# Altium PCB IMU_Shield.PcbDoc
Units mm, origin at the board's own origin, x right, y up, seen from the top; angles counter-clockwise.
Board outline 68.6 x 53.3 mm, 2 copper layers (Top Layer, Bottom Layer); 30 components, 25 nets, 123 pads, 40 vias.
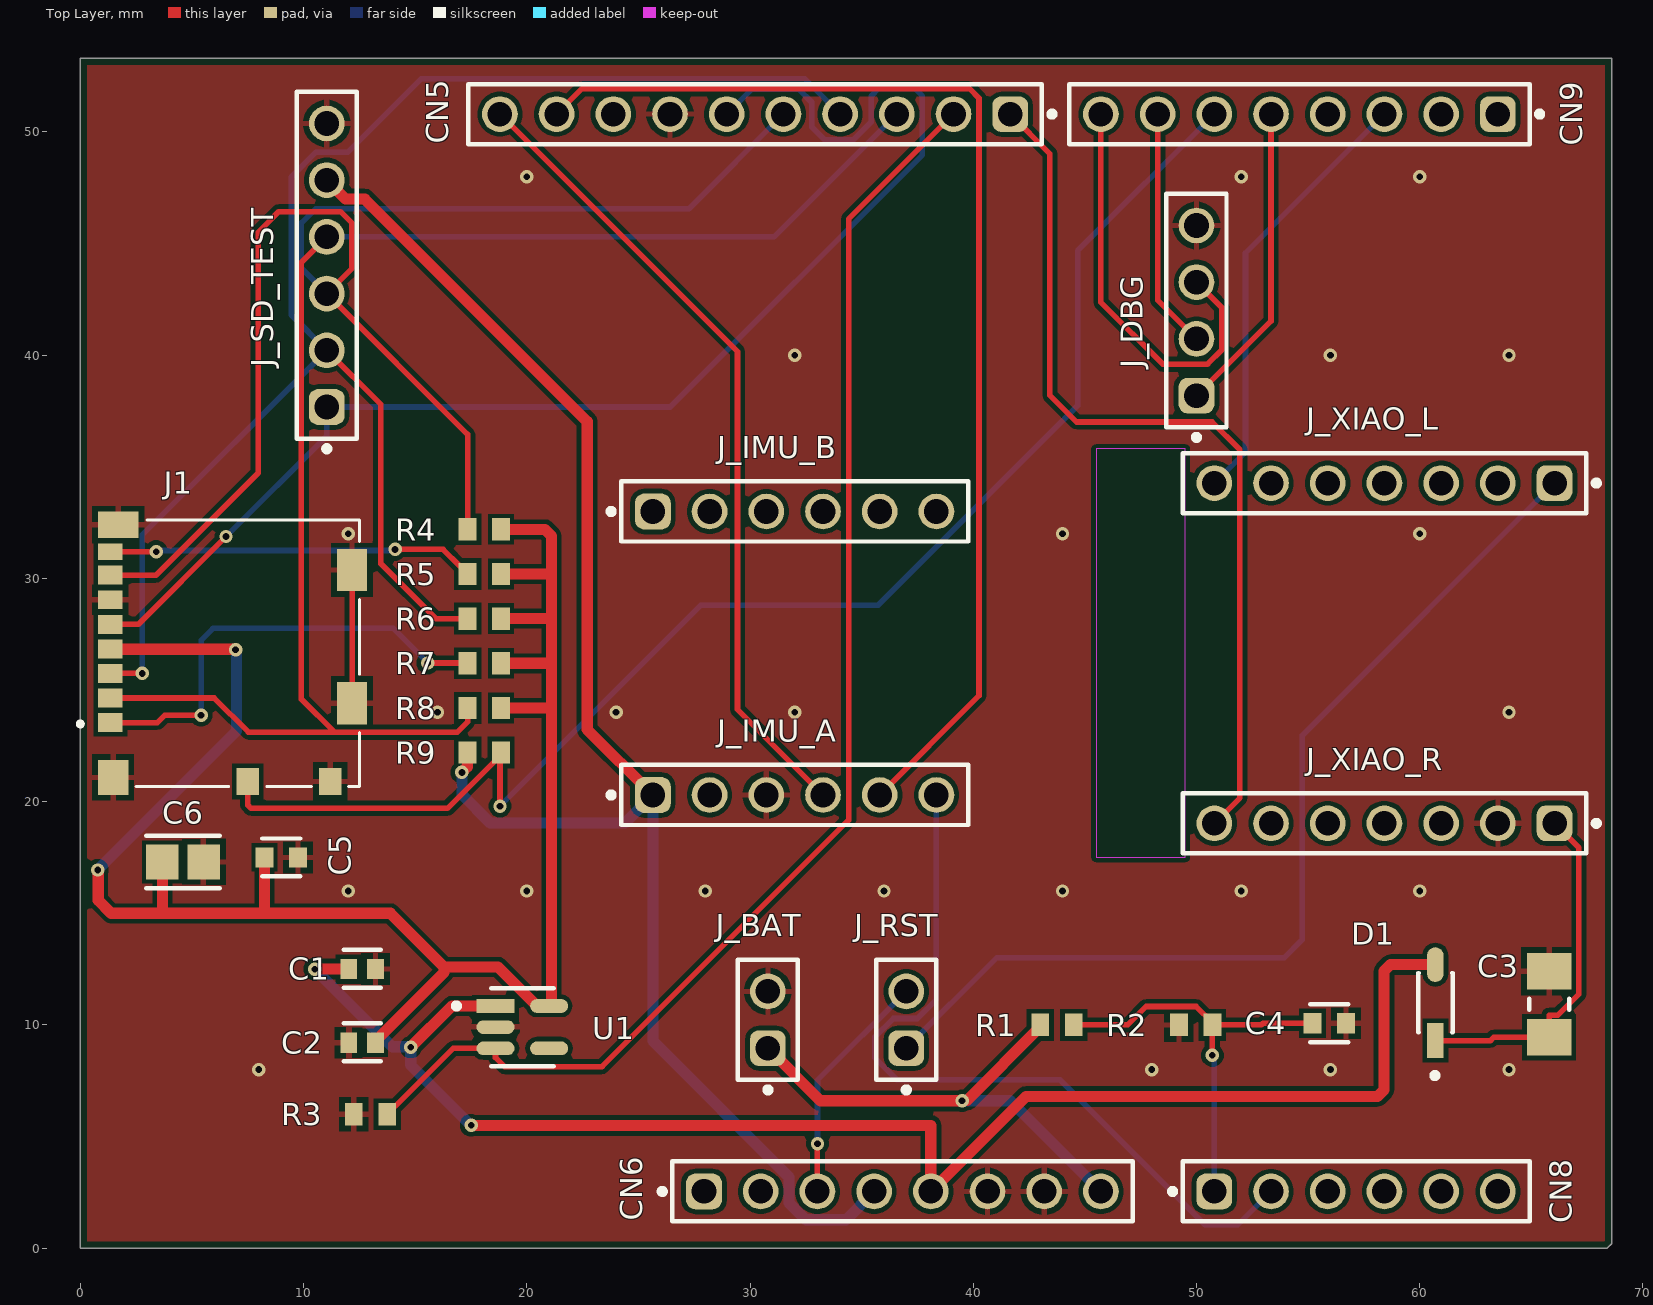
[diagram p0: Top Layer view]
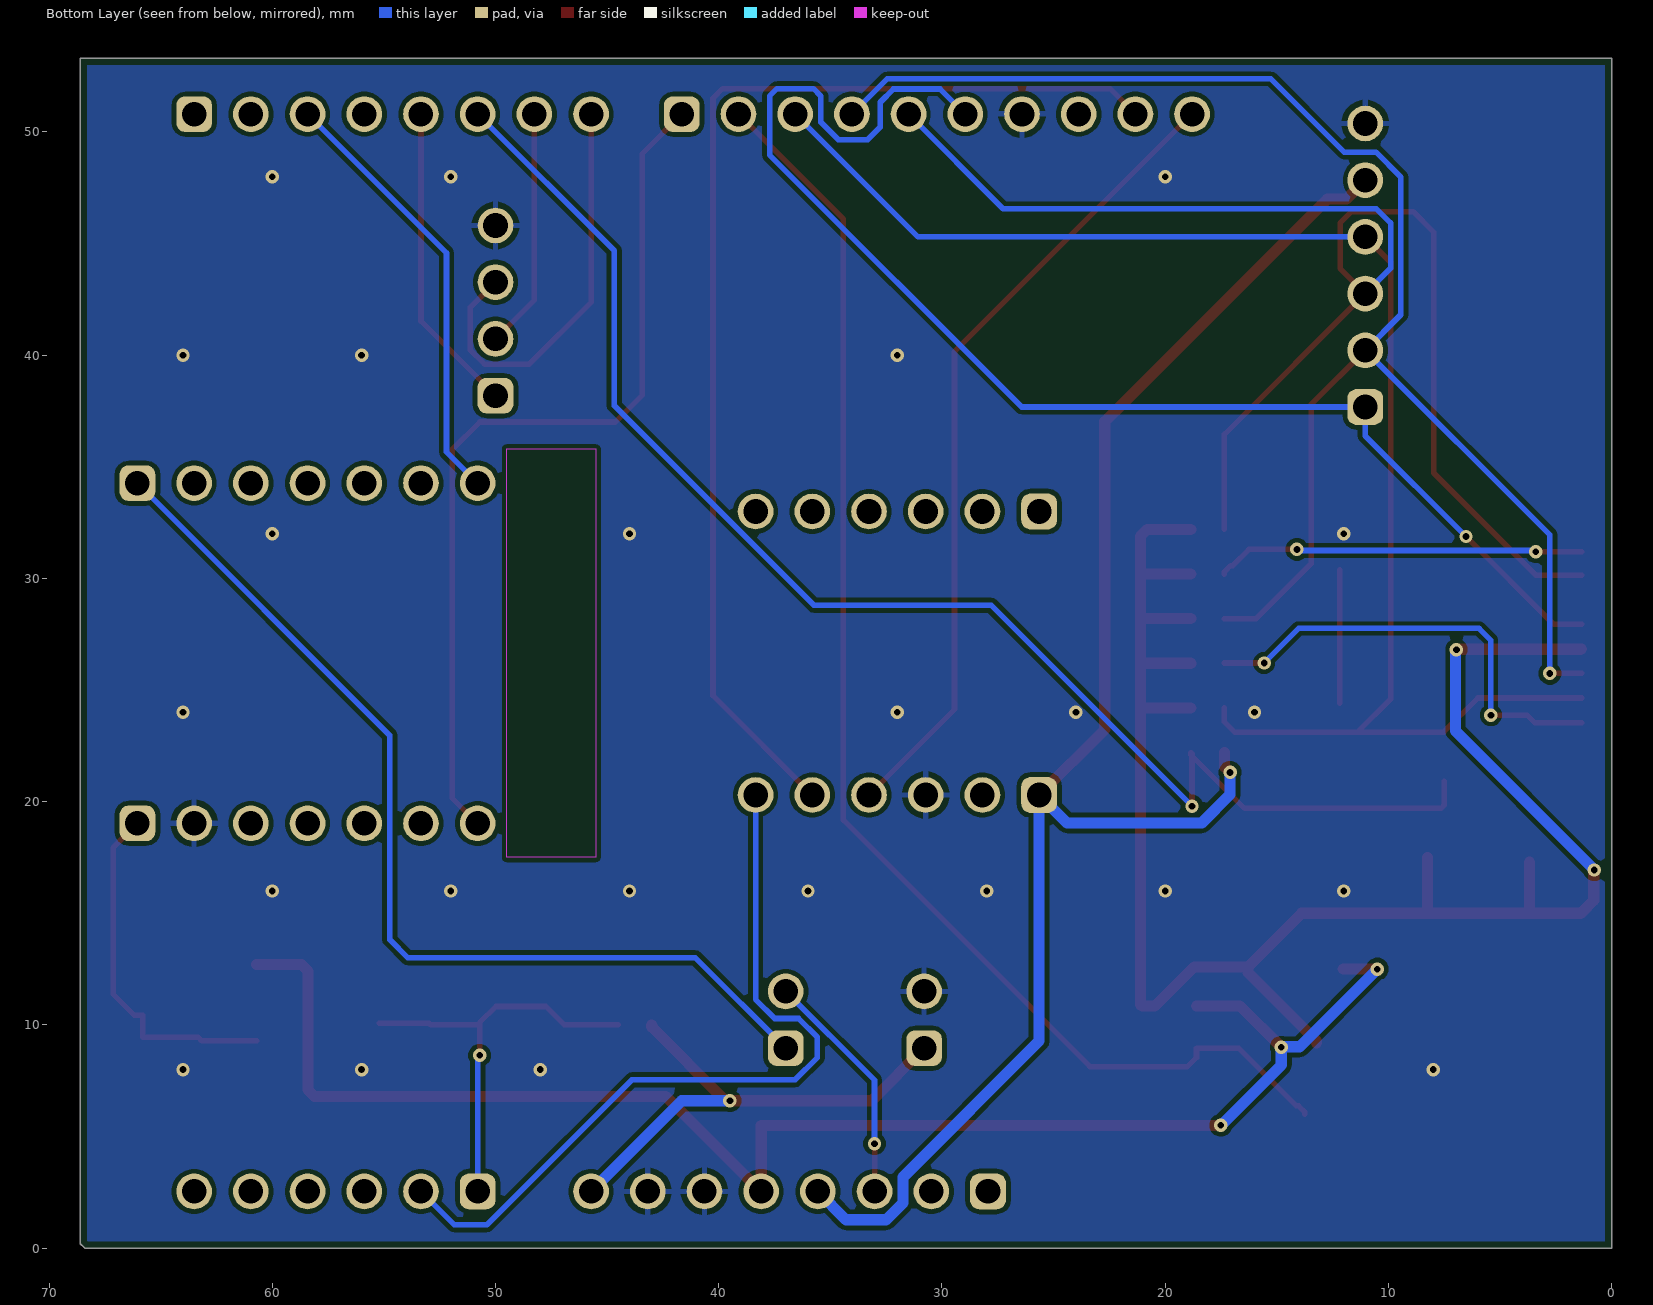
[diagram p1: Bottom Layer view, seen from below]
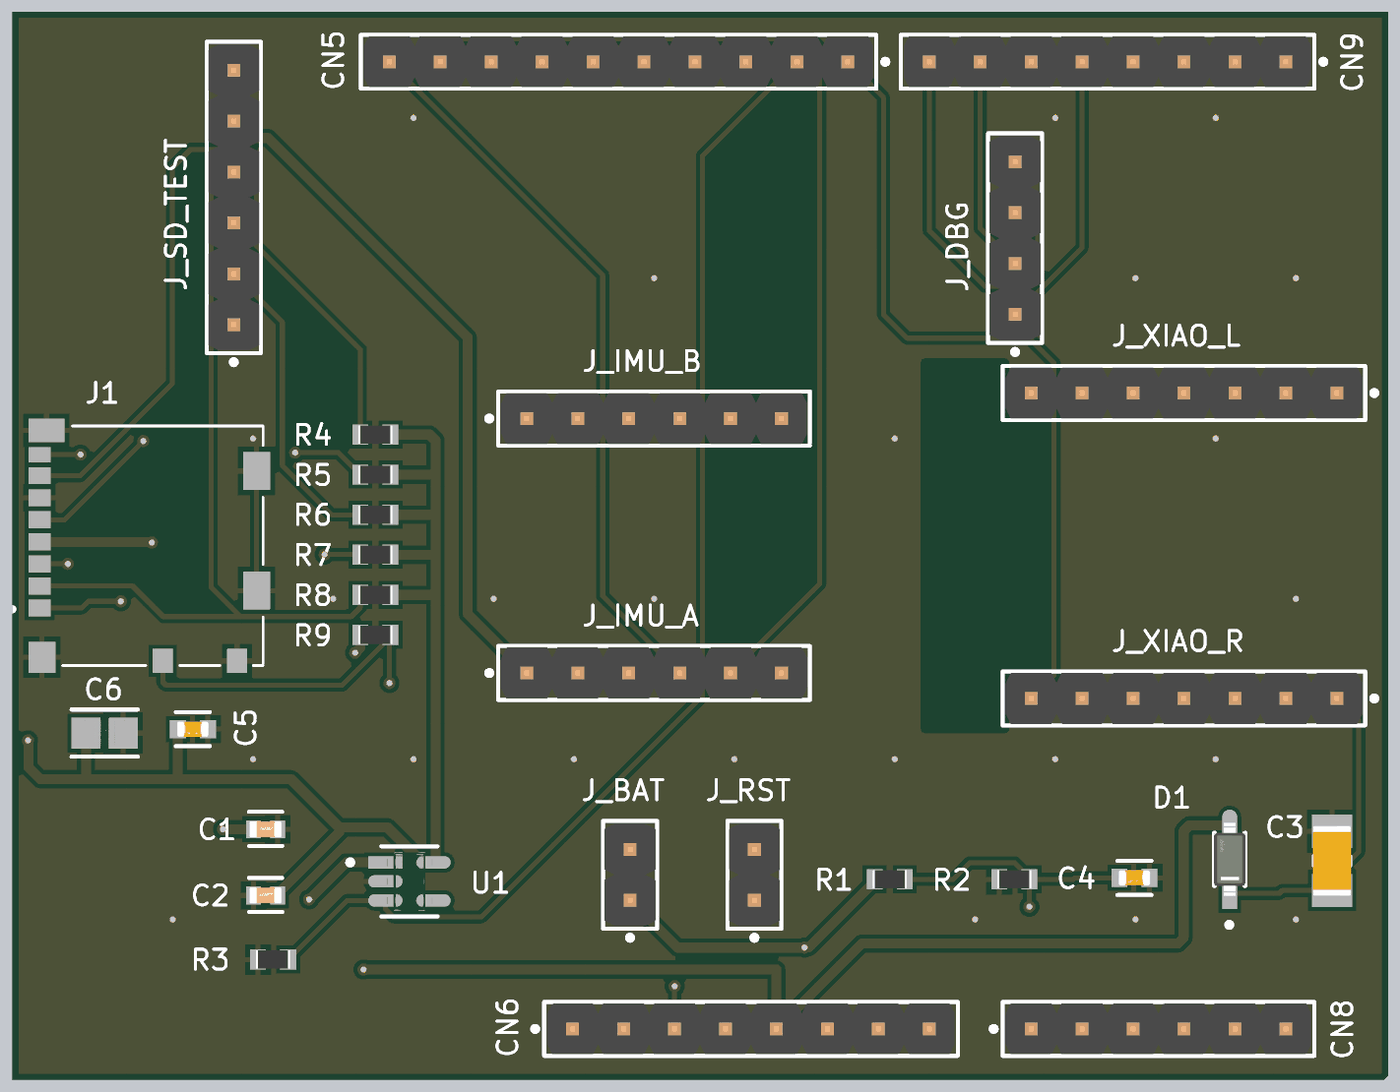
[diagram p2: 3D render of the assembled board from above, using the file's embedded part models]

## Layer stack, top to bottom
Top Solder: solder mask 0.0102, Solder Resist, Dk 3.5
Top Layer: signal copper 0.0356
Dielectric 1: dielectric 0.32, FR-4, Dk 4.8
Bottom Layer: signal copper 0.0356
Bottom Solder: solder mask 0.0102, Solder Resist, Dk 3.5

## Board outline
0,0 0,53.3 68.6,53.3 68.6,0.2 68.4,0

## Design rules (kind name [scope] priority, off if disabled: settings)
BoardOutlineClearance [All] p1: gap=0.3 ignorepadtopadclearanceinfootprint=FALSE
Clearance [All] p1: gap=0.2 ignorepadtopadclearanceinfootprint=FALSE
MinimumSolderMaskSliver [All] p1: minsoldermaskwidth=0.13
PolygonConnect [All] p1: connectstyle=Relief reliefconductorwidth=0.254 reliefentries=4 polygonreliefangle="90 Angle" airgapwidth=0.254
RoutingVias [All] p1: holewidth=0.3 width=0.6 viastyle="Through Hole" minholewidth=0.3 minwidth=0.6 maxholewidth=0.711 maxwidth=1.27
SilkToSolderMaskClearance [IsPad] p1: minsilkscreentomaskgap=0.15 clearancetoexposedcopper=TRUE
SolderMaskExpansion [All] p1: expansion=0 istentingtop=FALSE
SupplyNets "Schematic Supply Nets_1" [InNet('GND')] p1: voltage=0.000
SupplyNets "Schematic Supply Nets" [InNet('5V')] p2: voltage=0.000
Width PowerWidth [InNet('5V') Or InNet('3V3') Or InNet('SD_3V3') Or InNet('VIN') Or InNet('XIAO_5V')] p1: maxlimit=1 minlimit=0.3 preferedwidth=0.5
Width [All] p2: maxlimit=1 minlimit=0.2 preferedwidth=0.25
28 further rules are at their usual default settings.

## Components (designator, comment, footprint, x,y, rotation, side; value= is the part's Value field where it differs from the comment)
C1 "1u" FP-C0603-CJ-MFG 12.625,12.5 r0 top value=1uF
C2 "1u" FP-C0603-CJ-MFG 12.625,9.202 r0 top value=1uF
C3 "100u" CAPC3216X190X55ML30T25 65.8,10.925 r90 top
C4 "100n" FP-CC0603-DA-MFG 55.95,10.075 r0 top value="100 nF"
C5 "100n" FP-CC0603-DA-MFG 9,17.5 r0 top value="100 nF"
C6 "10u" FP-CL21-IPC_A 4.6,17.3 r0 top
CN5 "61301011121" 61301011121 30.226,50.8 r180 top locked
CN6 "61300811121" 61300811121 36.83,2.54 r0 top locked
CN8 "61300611121" 61300611121 57.15,2.54 r0 top locked
CN9 "61300811121" 61300811121 54.61,50.8 r180 top locked
D1 "B5819W" FP-SOD123-IPC_A 60.7,11 r90 top
J1 "104031-0811" MOLEX_104031-0811 6.8,26.65 r270 top locked
J_BAT "Battery in 7-12V" 61300211121 30.8,10.23 r90 top
J_DBG "61300411121" 61300411121 50,42 r90 top
J_IMU_A "61300611121" 61300611121 32,20.3 r0 top
J_IMU_B "61300611121" 61300611121 32,33 r0 top
J_RST "61300211121" 61300211121 37,10.23 r90 top
J_SD_TEST "61300611121" 61300611121 11.04,44.03 r90 top
J_XIAO_L "61300711121" 61300711121 58.42,34.27 r180 top
J_XIAO_R "61300711121" 61300711121 58.42,19.03 r180 top
R1 "Resistor 100k +/-1% 0603 100 mW" RESC1608X55X25ML10T15 43.75,10 r0 top value=100k
R2 "33k" RESC1608X55X25ML10T15 49.963,10 r0 top
R3 "Resistor 100k +/-1% 0603 100 mW" RESC1608X55X25ML10T15 13,6 r0 top value=100k
R4 "47k" RESC1608X55X25ML10T15 18.1,32.2 r0 top locked
R5 "47k" RESC1608X55X25ML10T15 18.1,30.2 r0 top locked
R6 "47k" RESC1608X55X25ML10T15 18.1,28.2 r0 top locked
R7 "47k" RESC1608X55X25ML10T15 18.1,26.2 r0 top locked
R8 "47k" RESC1608X55X25ML10T15 18.1,24.2 r0 top locked
R9 "47k" RESC1608X55X25ML10T15 18.1,22.2 r0 top locked
U1 "AP2112K-3.3TRG1" FP-SOT25-IPC_A 19.8,9.9 r0 top

## Footprints (in the part's own frame and the unit in brackets; to place one, negate y for a bottom-side part, rotate by r counter-clockwise, add the part's x,y. Pads: shape width x height; smd on the part's side, far side on the other; paste and mask are expansions set on the pad)
61300211121 [mm] "Pin Header, pitch 2.54 mm, THT, Vertical, single row, 2p"
  rrect50% 1.6x1.6 hole 1.1: 1(-1.27,0)
  round 1.6 hole 1.1: 2(1.27,0)
  silkscreen extent -3.26,-1.35 2.69,1.34, body extent -2.54,-1.27 2.54,1.27, height 8.57
61300411121 [mm] "Pin Header, pitch 2.54 mm, THT, Vertical, single row, 4p"
  rrect50% 1.6x1.6 hole 1.1: 1(-3.81,0)
  round 1.6 hole 1.1: 2(-1.27,0) 3(1.27,0) 4(3.81,0)
  silkscreen extent -5.8,-1.34 5.23,1.34, body extent -5.08,-1.27 5.08,1.27, height 8.57
61300611121 [mm] "Pin Header, pitch 2.54 mm, THT, Vertical, single row, 6p"
  rrect50% 1.6x1.6 hole 1.1: 1(-6.35,0)
  round 1.6 hole 1.1: 2(-3.81,0) 3(-1.27,0) 4(1.27,0) 5(3.81,0) 6(6.35,0)
  silkscreen extent -8.34,-1.34 7.77,1.34, body extent -7.62,-1.27 7.62,1.27, height 8.57
61300711121 [mm] "Pin Header, pitch 2.54 mm, THT, Vertical, single row, 7p"
  rrect50% 1.6x1.6 hole 1.1: 1(-7.62,0)
  round 1.6 hole 1.1: 2(-5.08,0) 3(-2.54,0) 4(0,0) 5(2.54,0) 6(5.08,0) 7(7.62,0)
  silkscreen extent -9.61,-1.35 9.04,1.34, body extent -8.89,-1.27 8.89,1.27, height 8.57
61300811121 [mm] "Pin Header, pitch 2.54 mm, THT, Vertical, single row, 8p"
  rrect50% 1.6x1.6 hole 1.1: 1(-8.89,0)
  round 1.6 hole 1.1: 2(-6.35,0) 3(-3.81,0) 4(-1.27,0) 5(1.27,0) 6(3.81,0) 7(6.35,0) 8(8.89,0)
  silkscreen extent -10.88,-1.34 10.31,1.34, body extent -10.16,-1.27 10.16,1.27, height 8.57
61301011121 [mm] "Pin Header, pitch 2.54 mm, THT, Vertical, single row, 10p"
  rrect50% 1.6x1.6 hole 1.1: 1(-11.43,0)
  round 1.6 hole 1.1: 2(-8.89,0) 3(-6.35,0) 4(-3.81,0) 5(-1.27,0) 6(1.27,0) 7(3.81,0) 8(6.35,0) 9(8.89,0) 10(11.43,0)
  silkscreen extent -13.42,-1.34 12.85,1.34, body extent -12.7,-1.27 12.7,1.27, height 8.57
CAPC3216X190X55ML30T25 [mm] "Chip Capacitor, 2-Leads, Body 3.5x1.9mm, IPC Low Density"
  rect 1.65x2 smd: 1(-1.475,0) 2(1.475,0)
  silkscreen extent -0.25,-0.9 0.25,0.9, body extent -1.75,-0.95 1.75,0.95, height 1.9
FP-C0603-CJ-MFG [mm]
  rect 0.75x0.9 smd paste+0 mask+0: 1(-0.6,0) 2(0.6,0)
  silkscreen extent -0.83,-0.83 0.83,0.87, body extent -1.2,-0.6 1.2,0.6, height 0.25
FP-CC0603-DA-MFG [mm]
  rect 0.8x0.9 smd paste+0 mask+0: 1(-0.75,0) 2(0.75,0)
  silkscreen extent -0.85,-0.85 0.85,0.85, body extent -1.35,-0.75 1.35,0.75, height 0.25
FP-CL21-IPC_A [mm]
  rect 1.455x1.556 smd paste+0 mask+0: 1(-0.926,0) 2(0.926,0)
  silkscreen extent -1.65,-1.18 1.65,1.18, body extent -2.15,-1.28 2.15,1.28, height 0.25
FP-SOD123-IPC_A [mm]
  rect 1.557x0.742 smd paste+0 mask+0: 1(-1.7,0)
  rrect100% 1.557x0.742 smd paste+0 mask+0: 2(1.7,0)
  silkscreen extent -3.39,-0.78 1.32,0.77, body extent -2.98,-1.28 2.98,1.28, height 0.25
FP-SOT25-IPC_A [mm]
  rect 1.707x0.616 smd paste+0 mask+0: 1(-1.201,0.95)
  rrect100% 1.707x0.616 smd paste+0 mask+0: 2(-1.201,0) 3(-1.201,-0.95) 4(1.201,-0.95) 5(1.201,0.95)
  silkscreen extent -3.08,-1.75 1.4,1.75, body extent -2.55,-2 2.55,2, height 0.25
MOLEX_104031-0811 [mm]
  rect 0.85x1.1 smd: 1(3.105,-5.45) 2(2.005,-5.45) 3(0.905,-5.45) 4(-0.195,-5.45) 5(-1.295,-5.45) 6(-2.395,-5.45) 7(-3.495,-5.45)
  rect 0.75x1.1 smd: 8(-4.545,-5.45)
  rect 1.2x1 smd: 9(5.74,0.7) 10(5.74,4.4)
  rect 1.55x1.35 smd: G1(5.565,-5.325)
  rect 1.17x1.8 smd: G2(-5.755,-5.1)
  rect 1.9x1.35 smd: G3(-3.73,5.375) G4(2.24,5.375)
  silkscreen extent -5.97,-6.9 5.98,5.7
RESC1608X55X25ML10T15 [mm] "Chip Resistor, 2-Leads, Body 1.70x0.90mm, IPC Low Density"
  rect 0.8x1 smd: 1(-0.75,0) 2(0.75,0)
  body extent -0.85,-0.45 0.85,0.45, height 0.55

## Part data
C1 C2: library part CMP-03020-024138-1, "CAP CER 0603 1UF 10V X7R 10%", Capacitance=1uF, LCSC=C15849, Manufacturer=KEMET, Manufacturer Part Number=C0603C105K8RACAUTO, Package=C0603-CJ, Temperature="-55°C to +125°C", Temperature Characteristic=X7R, Temperature Coefficient=15%, Temperature Range High=+125°C, Temperature Range Low=-55°C, Tolerance=10%, Voltage Rating=10V, Automotive=Yes, Automotive Grade="Grade 1", Category=Cap, ComponentLink2Description=Datasheet, ComponentLink2URL=https://content.kemet.com/datasheets/KEM_C1023_X7R_AUTO_SMD.pdf, Device Class L1="Passive Components", Device Class L2=Capacitors, Device Class L3="Ceramic Capacitors", Digikey Description="CAP CER 0603 1UF 10V X7R 10%", Height=0.95mm, Ipc Land Pattern Name=CAPC16080X80, Lead Free=Yes, Material=Ceramic, Octopart=https://octopart.com/c0603c105k8racauto-kemet-91328492, RoHS=TRUE
  C1: Name=C15849
C3: library part CMP-1662-00011-2, "Chip Capacitor, 100 uF, +/- 20%, 6.3 V, -55 to 85 degC, 1206 (3216 Metric), RoHS, Tape and Reel", Capacitance="100 uF", Case Code (Imperial)=1206, Case Code (Metric)=3216, LCSC=C15008, Max Operating Temperature="85 degC", Min Operating Temperature="-55 degC", Package Quantity=2000, PartNumber=GRM31CR60J107ME39L, Tolerance=20%, Type (Capacitors)=X5R, Voltage Rating="6.3 V", Case\/Package=1206, ComponentLink1Description="Manufacturer URL", ComponentLink1URL=http://www.murata.com/, ComponentLink2Description=Datasheet, ComponentLink2URL=http://psearch.en.murata.com/capacitor/product/GRM31CR60J107ME39%23.pdf, DatasheetVersion=09/2016, Height="1.6 mm", Length="3.2 mm", Mount="Surface Mount", Mounting Technology="Surface Mount", PackageDescription="2-Pin Surface Mount Device, Body 3.2 x 1.6 mm", PackageReference=1206, Packaging="Tape and Reel", Pins=2, Radiation Hardening=No, REACH SVHC="No SVHC", RoHSCompliant=true, Voltage Rating (DC)="6.3 V", Width="1.6 mm"
C4 C5: library part CMP-2100-03601-2, "CAP CER 0.1UF 50V X7R 0603", Capacitance="100 nF", LCSC=C14663, Manufacturer=YAGEO, Manufacturer Part Number=CC0603KRX7R9BB104, Package=CC0603-DA, Temperature="-55°C to +125°C", Temperature Characteristic=X7R, Temperature Coefficient=15%, Temperature Range High=+125°C, Temperature Range Low=-55°C, Tolerance=0.1, Voltage="50 V", Automotive=No, Category=Cap, ComponentLink2Description=Datasheet, ComponentLink2URL=http://www.yageo.com/documents/recent/UPY-GPHC_X7R_6.3V-to-50V_18.pdf, Device Class L1="Passive Components", Device Class L2=Capacitors, Device Class L3="Ceramic Capacitors", Digikey Description="CAP CER 0.1UF 50V X7R 0603", Footprint Url=http://www.yageo.com/exep/pages/download/literatures/UPY-C_GEN_24.pdf, Height=0.9mm, Lead Free=Yes, Material=Ceramic, Mouser Description="Multilayer Ceramic Capacitor, CC Series, 0.1 - F, - 10%, X7R, 50 V, 0603 [1608 Metric]", Octopart=https://octopart.com/cc0603krx7r9bb104-yageo-42244635, RoHS=TRUE, Voltage Rating="50 V"
C6: library part CMP-13271-002975-1, "CL21 Series 0805 10uF 25V ±10% Tolerance X5R Multilayer Ceramic Chip Capacitor", Capacitance=10uF, Case Code (Imperial)=0805, Case Code (Metric)=2012, Dielectric=X5R, LCSC=C15850, Max Operating Temperature=85°C, Min Operating Temperature=-55°C, Package Quantity=1, Tolerance=10%, Voltage Rating=25V, Case/Package=0805, Depth=1.25mm, Height=1.25mm, Length=2mm, Mount="Surface Mount", Packaging="Tape and Reel", Radiation Hardening=No, Thickness=0.057inch, Width=0.049inch
CN5: library part CMP-1502-01082-6, "THT Vertical Pin Header WR-PHD, Pitch 2.54 mm, Single Row, 10 pins", Color=Black, Contact Resistance=20mΩ, Current Rating=3A, Flammability Rating="UL94 V-0", Insulation Resistance=1GΩ, Max Operating Temperature=105°C, Min Operating Temperature=-40°C, Operating Supply Voltage=250V, Connector Type="Male Pin", Contact Gender=Male, Contact Material=Gold, Contact Mating Length=5.9944mm, Contact Plating=Gold, Gender=Male, Height=8.74mm, Housing Material=PBT, Lead Pitch=2.54mm, Length=2.54mm, Mount="Through Hole", Number of Contacts=10, Number of Pins=10, Number of Positions=10, Number of Rows=1, Orientation=Vertical, Packaging=Bulk, Pitch=2.54mm, RoHS=Compliant, Termination=Solder, Voltage Rating=250V, Width=25.4mm
CN6 CN9: library part CMP-1502-01076-4, "THT Vertical Pin Header WR-PHD, Pitch 2.54 mm, Single Row, 8 pins", Color=Black, Contact Resistance=20mΩ, Current Rating=3A, Max Operating Temperature=105°C, Min Operating Temperature=-40°C, Operating Supply Voltage=250V, Connector Type="Male Pin", Contact Material=Gold, Contact Mating Length=5.9944mm, Contact Plating=Gold, Gender=Male, Height=8.54mm, Lead Pitch=2.54mm, Mount="Through Hole", Number of Contacts=8, Number of Pins=8, Number of Positions=8, Number of Rows=1, Orientation=Vertical, Packaging=Bulk, Pitch=2.54mm, RoHS=Compliant, Termination=Solder, Voltage Rating=250V
CN8 J_IMU_A J_IMU_B J_SD_TEST: library part CMP-1502-01070-4, "THT Vertical Pin Header WR-PHD, Pitch 2.54 mm, Single Row, 6 pins", Color=Black, Contact Resistance=20mΩ, Current Rating=3A, Max Operating Temperature=105°C, Min Operating Temperature=-40°C, Operating Supply Voltage=250V, Connector Type="Male Pin", Contact Gender=Male, Contact Material=Gold, Contact Mating Length=5.9944mm, Contact Plating=Gold, Gender=Male, Height=8.89mm, Housing Material=PBT, Lead Free="Lead Free", Lead Pitch=2.54mm, Mount="Through Hole", Number of Contacts=6, Number of Pins=6, Number of Positions=6, Number of Rows=1, Orientation=Vertical, Packaging=Bulk, Pitch=2.54mm, RoHS=Compliant, Termination="Through Hole", Voltage Rating=250V
D1: library part CMP-0303-00003-3, "DIODE SCHOTTKY 40V 1A SOD123", Average Rectified Current=1A, Capacitance=110pF, Case/Package=SOD-123-2, Forward Voltage=450mV, LCSC=C8598, Max Forward Surge Current (Ifsm)=25A, Max Operating Temperature=125°C, Max Power Dissipation=450mW, Max Repetitive Reverse Voltage (Vrrm)=40V, Min Operating Temperature=-65°C, Package Quantity=3000, Peak Reverse Current=50uA, Contact Plating=Tin, Current Rating=1A, Element Configuration=Single, Forward Current=1A, Height=1.25mm, Lead Free="Lead Free", Length=2.85mm, Max Reverse Voltage (DC)=40V, Number of Pins=2, Output Current=1A, Packaging="Tape and Reel", Peak Non-Repetitive Surge Current=25A, Polarity=Standard, Radiation Hardening=No, REACH SVHC="No SVHC", Termination=SMD/SMT, Voltage Rating (DC)=40V, Weight=0.000353oz, Width=1.7mm
J1: library part CMP-003-000000-1, "Surface Mount Micro SD Card Connector, with Push In Termination", LCSC=C585350, Package=None, Check_prices=https://www.snapeda.com/parts/104031-0811/Molex/view-part/?ref=eda, Component Type=Standard, Design Item ID=104031-0811, MF=Molex, MP=104031-0811, Pin Count=14, SnapEDA_Link=https://www.snapeda.com/parts/104031-0811/Molex/view-part/?ref=snap, Source=104031-0811.SchLib
J_BAT J_RST: library part CMP-1712-00002-7, "THT Vertical Pin Header WR-PHD, Pitch 2.54 mm, Single Row, 2 pins", Color=Black, Contact Resistance=20mΩ, Current Rating=3A, Max Operating Temperature=105°C, Min Operating Temperature=-40°C, Operating Supply Voltage=250V, Connector Type="Male Pin", Contact Gender=Male, Contact Material=Gold, Contact Mating Length=5.9944mm, Contact Plating=Gold, Gender=Male, Height=8.94mm, Housing Material=PBT, Lead Free="Lead Free", Lead Pitch=2.54mm, Mount="Through Hole", Number of Contacts=2, Number of Pins=2, Number of Positions=2, Number of Rows=1, Orientation=Vertical, Packaging=Bulk, Pitch=2.54mm, REACH SVHC=No, RoHS=Compliant, Termination="Through Hole", Voltage Rating=250V
J_DBG: library part CMP-1502-01064-4, "THT Vertical Pin Header WR-PHD, Pitch 2.54 mm, Single Row, 4 pins", Color=Black, Contact Resistance=20mΩ, Current Rating=3A, Max Operating Temperature=105°C, Min Operating Temperature=-40°C, Operating Supply Voltage=250V, Connector Type="Male Pin", Contact Material=Gold, Contact Mating Length=5.9944mm, Contact Plating=Gold, Gender=Male, Height=8.89mm, Lead Free="Lead Free", Lead Pitch=2.54mm, Mount="Through Hole", Number of Contacts=4, Number of Pins=4, Number of Positions=4, Number of Rows=1, Orientation=Vertical, Packaging=Bulk, Pitch=2.54mm, RoHS=Compliant, Termination=Solder, Voltage Rating=250V
J_XIAO_L J_XIAO_R: library part CMP-1502-01074-4, "THT Vertical Pin Header WR-PHD, Pitch 2.54 mm, Single Row, 7 pins", Color=Black, Contact Resistance=20mΩ, Current Rating=3A, Operating Supply Voltage=250V, Connector Type="Male Pin", Contact Material=Copper, Contact Mating Length=5.9944mm, Contact Plating=Gold, Gender=Male, Lead Pitch=2.54mm, Mount="Through Hole", Number of Contacts=7, Number of Pins=7, Number of Positions=7, Number of Rows=1, Orientation=Vertical, Packaging=Bulk, Pitch=2.54mm, RoHS=Compliant, Termination=Solder
R1 R3: library part CMP-009-00023-5, "Chip Resistor, 100 KOhm, +/- 1%, 0.1 W, -55 to 155 degC, 0603 (1608 Metric)", Case/Package=0603, LCSC=C25803, Max Operating Temperature=155°C, Min Operating Temperature=-55°C, Power=100mW, Tolerance=1%, Voltage Rating=50V, Mounting Technology=SM, Pins=2, RoHS Compliant=True
R2: library part CMP-009-00023-5, "Chip Resistor, 33 KOhm, +/- 1%, 0.1 W, -55 to 155 degC, 0603 (1608 Metric)", Case/Package=0603, LCSC=C4216, Max Operating Temperature=155°C, Min Operating Temperature=-55°C, Power=100mW, Tolerance=1%, Voltage Rating=50V, Mounting Technology=SM, Pins=2, RoHS Compliant=True
R4 R5 R6 R7 R8 R9: library part CMP-009-00023-5, "Chip Resistor, 47 KOhm, +/- 1%, 0.1 W, -55 to 155 degC, 0603 (1608 Metric)", Case/Package=0603, LCSC=C25819, Max Operating Temperature=155°C, Min Operating Temperature=-55°C, Power=100mW, Tolerance=1%, Voltage Rating=50V, Mounting Technology=SM, Pins=2, RoHS Compliant=True
U1: library part CMP-12756-000035-1, "IC REG LINEAR 3.3V 600MA SOT25", Case/Package=SOT-23-5, Dropout Voltage=250mV, LCSC=C51118, Max Input Voltage=6V, Max Operating Temperature=85°C, Max Output Current=600mA, Min Input Voltage=2.5V, Min Operating Temperature=-40°C, Output Voltage=3.3V, Package Quantity=1, Quiescent Current=55uA, Accuracy=1.5%, Height=1.3mm, Lead Free="Lead Free", Length=3.1mm, Mount="Surface Mount", Number of Outputs=1, Number of Pins=5, Number of Regulators=1, Output Current=600mA, Output Type=Fixed, Packaging="Tape and Reel", Polarity=Positive, Width=1.7mm

## Via types
v1: diameter 0.6, hole 0.3, Top Layer to Bottom Layer, tented both sides, 40 vias

## Nets (pads, with @x,y where several pads share a name; then routed paths per layer and width w, separated by ;. In a path a pad name is that pad's centre, name@x,y a point inside that pad or via, vN(x,y) a via of type N, cw(c..) or ccw(c..) an arc to the next point about the centre after c; other vN are vias at no path point)
3V3: CN6.4 J_IMU_A.1 J_SD_TEST.5 R9.1 | length 71.1
  Top Layer w0.5: J_SD_TEST.5 11.88,47 12.74,47 22.708,37.032 22.708,23.242 J_IMU_A.1 ; v1(17.094,21.311) 17.35,21.566 R9.1
  Bottom Layer w0.5: v1(17.094,21.311) 17.094,20.32 18.364,19.05 24.4,19.05 J_IMU_A.1 25.65,9.275 31.75,3.175 31.75,2.032 32.512,1.27 34.29,1.27 CN6.4
5V: C1.1 CN6.5 D1.2 U1.1 | length 70
  Top Layer w0.5: v1(10.5,12.5) C1.1 ; v1@14.8,8.973 v1(14.8,9) 16.65,10.85 U1.1 ; v1(17.51,5.503) 17.503,5.503 17.5,5.5 38.1,5.5 CN6.5 42.36,6.8 58.107,6.8 58.4,7.093 58.4,12.407 58.693,12.7 D1.2
  Bottom Layer w0.5: v1(10.5,12.5) 13.981,9.019 14.781,9.019 v1(14.8,9) 14.8,8.213 v1(17.51,5.503)
DBG_HB: CN9.5 J_DBG.1 | length 14
  Top Layer w0.25: J_DBG.1 53.34,41.53 CN9.5
DBG_IMU: CN9.8 J_DBG.3 | length 18.8
  Top Layer w0.25: CN9.8 45.72,42.367 48.489,39.599 50.495,39.599 51.13,40.234 51.13,42.14 J_DBG.3
DBG_SD: CN9.7 J_DBG.2 | length 10.8
  Top Layer w0.25: CN9.7 48.26,42.47 J_DBG.2
GND: C1.2 C2.1 C3.2 C4.2 C5.2 C6.2 CN5.7 CN6.6 CN6.7 J1.6 J1.10 J1.G1 J1.G2 J1.G3 J1.G4 J_BAT.2 J_DBG.4 J_IMU_A.3 J_SD_TEST.6 J_XIAO_R.2 R2.1 R3.1 U1.2 | length 6
  Top Layer w0.25: J1.G4 J1.G3
  other v1: 8,8 48,8 56,8 64,8 12,16 20,16 28,16 36,16 44,16 52,16 60,16 16,24 24,24 32,24 64,24 12,32 44,32 60,32 32,40 56,40 64,40 20,48 52,48 60,48
IMU_INT: CN8.2 J_IMU_A.6 | length 35
  Bottom Layer w0.25: J_IMU_A.6 38.35,11.147 37.49,10.287 36.423,10.287 35.585,9.449 35.585,8.534 36.576,7.544 43.891,7.544 50.394,1.041 51.841,1.041 CN8.2
IMU_SCL: CN5.10 J_IMU_A.4 | length 36.5
  Top Layer w0.25: CN5.10 29.439,40.157 29.439,24.131 J_IMU_A.4
IMU_SDA: CN5.9 J_IMU_A.5 | length 52.6
  Top Layer w0.25: CN5.9 22.479,51.943 39.827,51.943 40.259,51.511 40.259,24.749 J_IMU_A.5
NetC3_1: C3.1 D1.1 J_XIAO_R.1 | length 16
  Top Layer w0.25: D1.1 63.17,9.3 63.32,9.45 C3.1 65.8,10.439 66.192,10.439 67.132,11.379 67.132,17.938 J_XIAO_R.1
NetJ1_1: J1.1 R7.1 | length 20.4
  Top Layer w0.25: J1.1 3.454,23.545 3.785,23.876 v1(5.41,23.876) ; v1(15.57,26.213) 17.35,26.213 R7.1
  Bottom Layer w0.25: v1(5.41,23.876) 5.41,27.229 5.944,27.762 14.021,27.762 v1(15.57,26.213)
NetJ1_8: J1.8 R5.1 | length 16.6
  Top Layer w0.25: J1.8 3.395,31.195 v1(3.4,31.2) ; v1(14.1,31.3) 16.25,31.3 16.975,30.575 17.075,30.575 17.35,30.3 R5.1
  Bottom Layer w0.25: v1(3.4,31.2) 3.45,31.25 14.05,31.25 v1(14.1,31.3)
NRST: CN6.3 J_RST.2 | length 10.6
  Top Layer w0.25: CN6.3 33.02,4.671 v1(33.024,4.675)
  Bottom Layer w0.25: v1(33.024,4.675) 33.024,7.524 J_RST.2
SD_3V3: C2.2 C5.1 C6.1 J1.4 R4.2 R5.2 R6.2 R7.2 R8.2 U1.5 | length 83.7
  Top Layer w0.5: v1(0.779,16.938) 0.8,16.918 0.8,15.586 1.386,15 3.7,15 ; J1.4 1.367,26.827 6.938,26.827 v1(6.955,26.81) ; C6.1 3.674,15.026 3.7,15 ; C5.1 8.25,15.007 8.243,15 ; C2.2 13.225,9.277 16.293,12.345 16.293,12.6 ; R8.2 21.1,24.2 ; R7.2 21,26.2 21.1,26.3 ; R6.2 21.1,28.2 ; R5.2 21,30.2 21.1,30.1 ; R4.2 20.807,32.2 21.1,31.907 21.1,30.1 ; 3.7,15 8.243,15 ; 8.243,15 13.893,15 16.293,12.6 ; 16.293,12.6 18.705,12.6 20.455,10.85 U1.5 21.046,10.85 21.1,10.904 21.1,24.2 ; 21.1,24.2 21.1,26.3 ; 21.1,26.3 21.1,28.2 ; 21.1,28.2 21.1,30.1
  Bottom Layer w0.5: v1(0.779,16.938) 7,23.159 7,26.8 6.965,26.8 v1(6.955,26.81)
SD_CD: CN9.6 J1.9 R9.2 | length 64.9
  Top Layer w0.25: J1.9 7.5,19.846 7.646,19.7 16.45,19.7 R9.2@18.8,22.05 ; v1(18.8,19.8) R9.2@18.8,22.05 ; R9.2@18.8,22.05 18.8,22.15 R9.2 18.85,22.1 R9.2@18.8,22.05
  Bottom Layer w0.25: v1(18.8,19.8) 27.802,28.802 35.743,28.802 44.679,37.738 44.679,44.679 CN9.6
SD_CS: CN5.3 J1.2 J_SD_TEST.4 R8.1 | length 68.5
  Top Layer w0.25: J1.2 5.994,24.645 7.525,23.114 11.379,23.114 ; J_SD_TEST.4 9.906,44.166 9.906,24.587 11.379,23.114 ; R8.1 17.35,23.571 16.893,23.114 11.379,23.114
  Bottom Layer w0.25: J_SD_TEST.4 31.076,45.3 CN5.3
SD_EN: CN5.2 R3.2 U1.3 | length 60.7
  Top Layer w0.25: R3.2 13.75,6.1 14.025,6.375 14.125,6.375 16.7,8.95 U1.3 18.599,8.534 19.006,8.128 23.368,8.128 34.417,19.177 34.417,46.101 CN5.2
SD_MISO: CN5.5 J1.7 J_SD_TEST.3 R4.1 | length 68.1
  Top Layer w0.25: J1.7 3.386,30.145 7.976,34.734 7.976,45.517 8.89,46.431 11.657,46.431 12.165,45.923 12.165,43.885 J_SD_TEST.3 17.35,36.45 R4.1
  Bottom Layer w0.25: J_SD_TEST.3 9.906,43.894 9.906,45.923 10.541,46.558 27.254,46.558 CN5.5
SD_MOSI: CN5.4 J1.3 J_SD_TEST.2 R6.1 | length 70.3
  Top Layer w0.25: J1.3 v1(2.769,25.745) ; J_SD_TEST.2 13.462,37.798 13.462,30.658 15.926,28.194 17.35,28.194 R6.1
  Bottom Layer w0.25: v1(2.769,25.745) 2.769,31.949 J_SD_TEST.2 9.449,41.811 9.449,47.981 10.566,49.098 11.989,49.098 15.266,52.375 32.461,52.375 CN5.4
SD_SCK: CN5.6 J1.5 J_SD_TEST.1 | length 61.1
  Top Layer w0.25: J1.5 2.596,27.945 v1(6.528,31.877)
  Bottom Layer w0.25: v1(6.528,31.877) 11.04,36.389 J_SD_TEST.1 26.428,37.68 37.719,48.971 37.719,51.613 37.389,51.943 35.763,51.943 35.433,51.613 35.433,50.444 34.646,49.657 33.325,49.657 32.766,50.216 32.766,51.333 32.174,51.925 30.081,51.925 CN5.6
UART1_RX: CN9.3 J_XIAO_L.7 | length 19.7
  Bottom Layer w0.25: J_XIAO_L.7 52.197,35.667 52.197,44.577 CN9.3
UART1_TX: CN5.1 J_XIAO_R.7 | length 40.1
  Top Layer w0.25: CN5.1 43.434,49.022 43.434,38.202 44.628,37.008 50.698,37.008 51.943,35.763 51.943,20.173 J_XIAO_R.7
VBAT_SENSE: C4.1 CN8.1 R1.2 R2.2 | length 19
  Top Layer w0.25: R1.2 46.919,10 47.744,10.825 49.988,10.825 50.713,10.1 R2.2 ; v1(50.713,8.636) R2.2 ; C4.1 52.983,10.075 52.908,10 R2.2
  Bottom Layer w0.25: v1(50.713,8.636) 50.8,8.549 CN8.1
VIN: CN6.8 J_BAT.1 R1.1 | length 22.5
  Top Layer w0.5: J_BAT.1 33.16,6.6 v1(39.5,6.6) 39.519,6.619 39.719,6.619 43,9.9 R1.1
  Bottom Layer w0.5: v1(39.5,6.6) 41.66,6.6 CN6.8
XIAO_RST: J_RST.1 J_XIAO_L.1 | length 44.9
  Bottom Layer w0.25: J_RST.1 41.045,13.005 53.924,13.005 54.737,13.818 54.737,22.967 J_XIAO_L.1
pads on no net: CN5.8 CN6.1 CN6.2 CN8.3 CN8.4 CN8.5 CN8.6 CN9.1 CN9.2 CN9.4 J_IMU_A.2 J_IMU_B.1 J_IMU_B.2 J_IMU_B.3 J_IMU_B.4 J_IMU_B.5 J_IMU_B.6 J_XIAO_L.2 J_XIAO_L.3 J_XIAO_L.4 J_XIAO_L.5 J_XIAO_L.6 J_XIAO_R.3 J_XIAO_R.4 J_XIAO_R.5 J_XIAO_R.6 U1.4

## Polygon pours and split planes (outlines as drawn)
GND on Bottom Layer "GND_L02_P001" (solid, remove dead copper, pour order 1): 0.1,53.3 0.1,0.1 0,0 68.6,0 68.6,53.2 68.5,53.3
GND on Top Layer "GND_L01_P000" (solid, remove dead copper, pour order 0): 0,0 68.6,0 68.5,0.1 68.5,53.3 0.1,53.3 0,53.4 0,53.7

## Keep-outs
Keep-Out Layer:
  rectangle: 45.5,17.5 49.5,35.8

## Other copper
Top Layer:
  pour cut-out: 45.5,17.5 45.5,35.8 49.5,35.8 49.5,17.5
Bottom Layer:
  pour cut-out: 45.5,35.8 49.5,35.8 49.5,17.5 45.5,17.5

## Silkscreen, mask and mechanical layers (free items; w line width, h text height)
Mechanical 1:
  the board outline again, w0.254